# Altium PCB PWM_Controller_Full_Bridge_TL494.PcbDoc (part 2 of 2)
Units mm, origin at the board's own origin, x right, y up, seen from the top; angles counter-clockwise.
Board outline 90 x 70 mm, 2 copper layers (Top Layer, Bottom Layer), stack 1.071 mm thick; 169 components, 72 nets, 398 pads, 71 vias.
Unrouted connection lines stored in the file: 17.
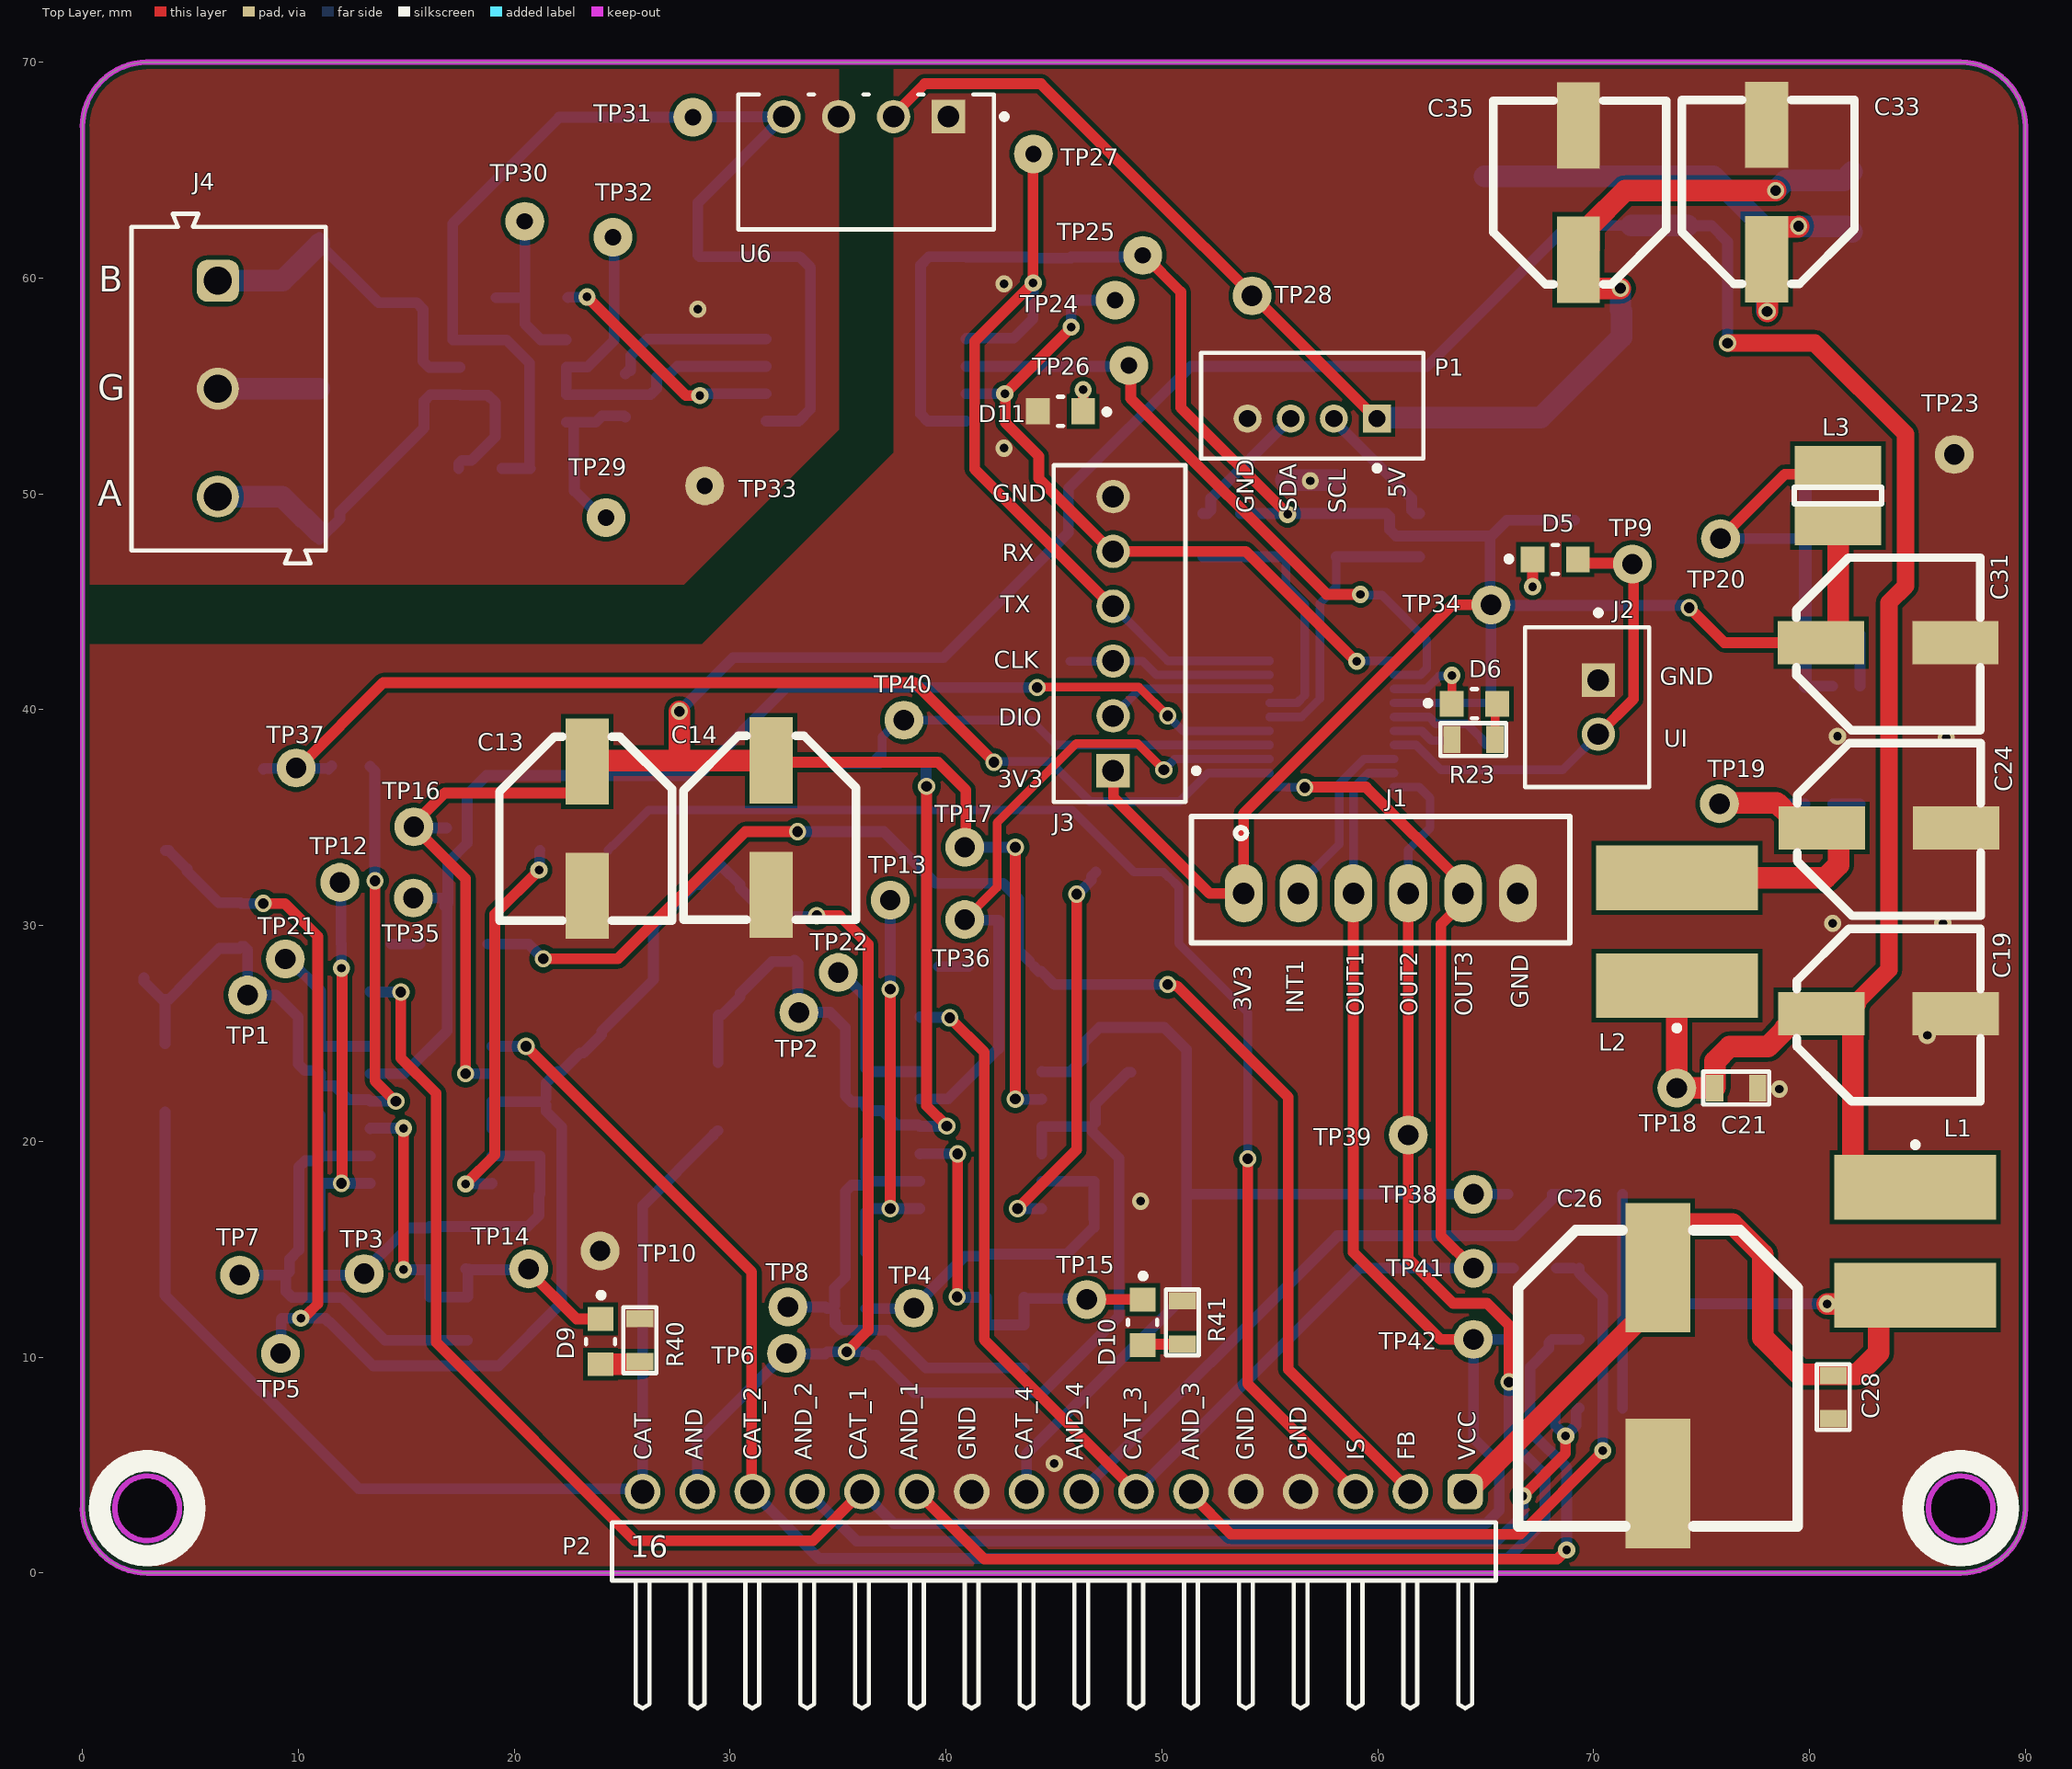
[diagram p0: Top Layer view]

## Via types
v1: diameter 0.8, hole 0.5, Top Layer to Bottom Layer, tented both sides, 37 vias
v2: diameter 0.8, hole 0.4, Top Layer to Bottom Layer, tented both sides, 34 vias

## Nets (pads, with @x,y where several pads share a name; then routed paths per layer and width w, separated by ;. In a path a pad name is that pad's centre, name@x,y a point inside that pad or via, vN(x,y) a via of type N, cw(c..) or ccw(c..) an arc to the next point about the centre after c; other vN are vias at no path point) (continued)
NetR47_1: (continued)
  Bottom Layer w0.5: R48.1 R47.1 ; TP30.1 R47.1 ; U8.1 22.4,57.145 21.221,57.145 20.49,57.876 R47.1
NetR47_2: R47.2 U7.11 | length 11.1
  Top Layer w0.5: v2(23.375,59.125) 27.95,54.55 v2(28.6,54.55)
  Bottom Layer w0.5: R47.2 22.506,59.109 23.359,59.109 v2(23.375,59.125) ; v2(28.6,54.55) 28.681,54.55 28.767,54.636 U7.11
NetR49_2: R49.2 TP32.1 U7.12 U8.2 U8.3 | length 18.9
  Bottom Layer w0.5: TP32.1 24.625,61.836 24.625,57.1 23.4,55.875 22.43,55.875 U8.2 U8.3 26.307,54.59 26.6,54.883 26.6,55.414 26.75,55.564 27.2,55.564 27.542,55.906 U7.12
NetR53_1: R53.1 R54.2 TP37.1 U1.12 | length 52.7
  Top Layer w0.5: TP37.1 9.986,37.3 13.939,41.253 38.542,41.253 v1(42.225,37.57)
  Bottom Layer w0.4: v1(42.225,37.57) 42.255,37.6 44.812,37.6 46.662,35.75 50.827,35.75 52.141,37.064 U1.12
  Bottom Layer w0.5: R54.2 8.404,37.275 9.875,37.275 TP37.1 9.925,37.275 R53.1@11.304,37.275 ; R53.1 R53.1@11.55,37.4
NetR55_1: R55.1 R56.2 TP40.1 U1.14 | length 24.2
  Bottom Layer w0.4: 36.529,37.528 R55.1@36.903,37.902 ; R55.1 37.051,38.753 37.475,39.177 37.924,39.177 38.051,39.05 TP40.1 43.948,39.516 45.099,38.364 U1.14
  Bottom Layer w0.5: R56.2 35.193,37.57 35.235,37.528 36.529,37.528 R55.1@36.904,37.528
NetU4_6: U4.6 U4.7 | length 1.3
  Bottom Layer w0.5: U4.7 U4.6
pads on no net: U4.5 U7.3 U7.14

## Polygon pours and split planes (outlines as drawn)
GND on Bottom Layer "NONET_L-01_P-001" (solid, pour order 3): 0.006,0 0,0.006 0,43.025 28.688,43.025 37.57,51.907 37.57,70 90,70 90,-0.025
GND_2 on Bottom Layer "NONET_L-01_P-001" (solid, pour order 1): 35.05,70.025 35.05,52.975 27.875,45.8 0.006,45.8 0.006,68.406 1.576,69.976
GND on Top Layer "NONET_L-01_P-001" (solid, pour order 2): 0.006,0 0,0.006 0,43.025 28.688,43.025 37.57,51.907 37.57,70 90,70 90,-0.025
GND_2 on Top Layer "NONET_L-01_P-001" (solid, pour order 0): 35.05,70.025 35.05,52.975 27.875,45.8 0.006,45.8 0.006,68.406 1.576,69.976

## Keep-outs
Keep-Out Layer:
  circle w0.254: c87,3 r1.5
  circle w0.254: c3,3 r1.5
  lines w0.254: 0,3 ccw(c3,3) 3,0 ; 0,67 cw(c3,67) 3,70 ; 0.006,3 0.006,67 ; 2.963,70 87,70 cw(c87,67) 90,67 90,3.05 ; 2.999,0 87,0 ccw(c87,3) 90,3

## Silkscreen, mask and mechanical layers (free items; w line width, h text height)
Top Overlay:
  circle w1: c87,3 r2.2
  circle w1: c3,3 r2.2
  text "B" at 0.75,59.375 h1.2
  text "G" at 0.7,54.35 h1.2
  text "5V" at 61.293,49.813 h0.8 r90
  text "GND" at 42.167,49.625 h0.8
  text "A" at 0.7,49.431 h1.2
  text "SDA" at 56.227,49.139 h0.8 r90
  text "GND" at 54.262,49.092 h0.8 r90
  text "SCL" at 58.514,49.092 h0.8 r90
  text "RX" at 42.6,46.889 h0.8
  text "TX" at 42.525,44.5 h0.8
  text "CLK" at 42.215,41.915 h0.8
  text "GND" at 73.061,41.15 h0.8
  text "DIO" at 42.425,39.25 h0.8
  text "UI" at 73.261,38.291 h0.8
  text "3V3" at 42.4,36.403 h0.8
  text "GND" at 66.974,26.166 h0.8 r90
  text "3V3" at 54.125,26.025 h0.8 r90
  text "INT1" at 56.55,25.925 h0.8 r90
  text "OUT1" at 59.35,25.8 h0.8 r90
  text "OUT2" at 61.829,25.8 h0.8 r90
  text "OUT3" at 64.38,25.8 h0.8 r90
  text "CAT" at 26.361,5.222 h0.8 r90
  text "AND" at 28.711,5.222 h0.8 r90
  text "CAT_2" at 31.431,5.222 h0.8 r90
  text "AND_2" at 33.781,5.222 h0.8 r90
  text "CAT_1" at 36.325,5.222 h0.8 r90
  text "AND_1" at 38.675,5.222 h0.8 r90
  text "GND" at 41.361,5.222 h0.8 r90
  text "CAT_4" at 44.002,5.222 h0.8 r90
  text "AND_4" at 46.352,5.222 h0.8 r90
  text "CAT_3" at 49.037,5.222 h0.8 r90
  text "AND_3" at 51.728,5.222 h0.8 r90
  text "GND" at 54.261,5.222 h0.8 r90
  text "GND" at 56.699,5.222 h0.8 r90
  text "IS" at 59.366,5.222 h0.8 r90
  text "FB" at 61.716,5.222 h0.8 r90
  text "VCC" at 64.511,5.222 h0.8 r90

## Text inside footprints (layer, text, board x,y; h text height)
P2: Top Overlay "16" at 25.367,0.725 h1.02